# Altium PCB Nodo_Ambiente_pcb.PcbDoc
Units mm, origin at the board's own origin, x right, y up, seen from the top; angles counter-clockwise.
Board outline 76 x 55 mm, 2 copper layers (Top Layer, Bottom Layer); 7 components, 15 nets, 80 pads, 0 vias.
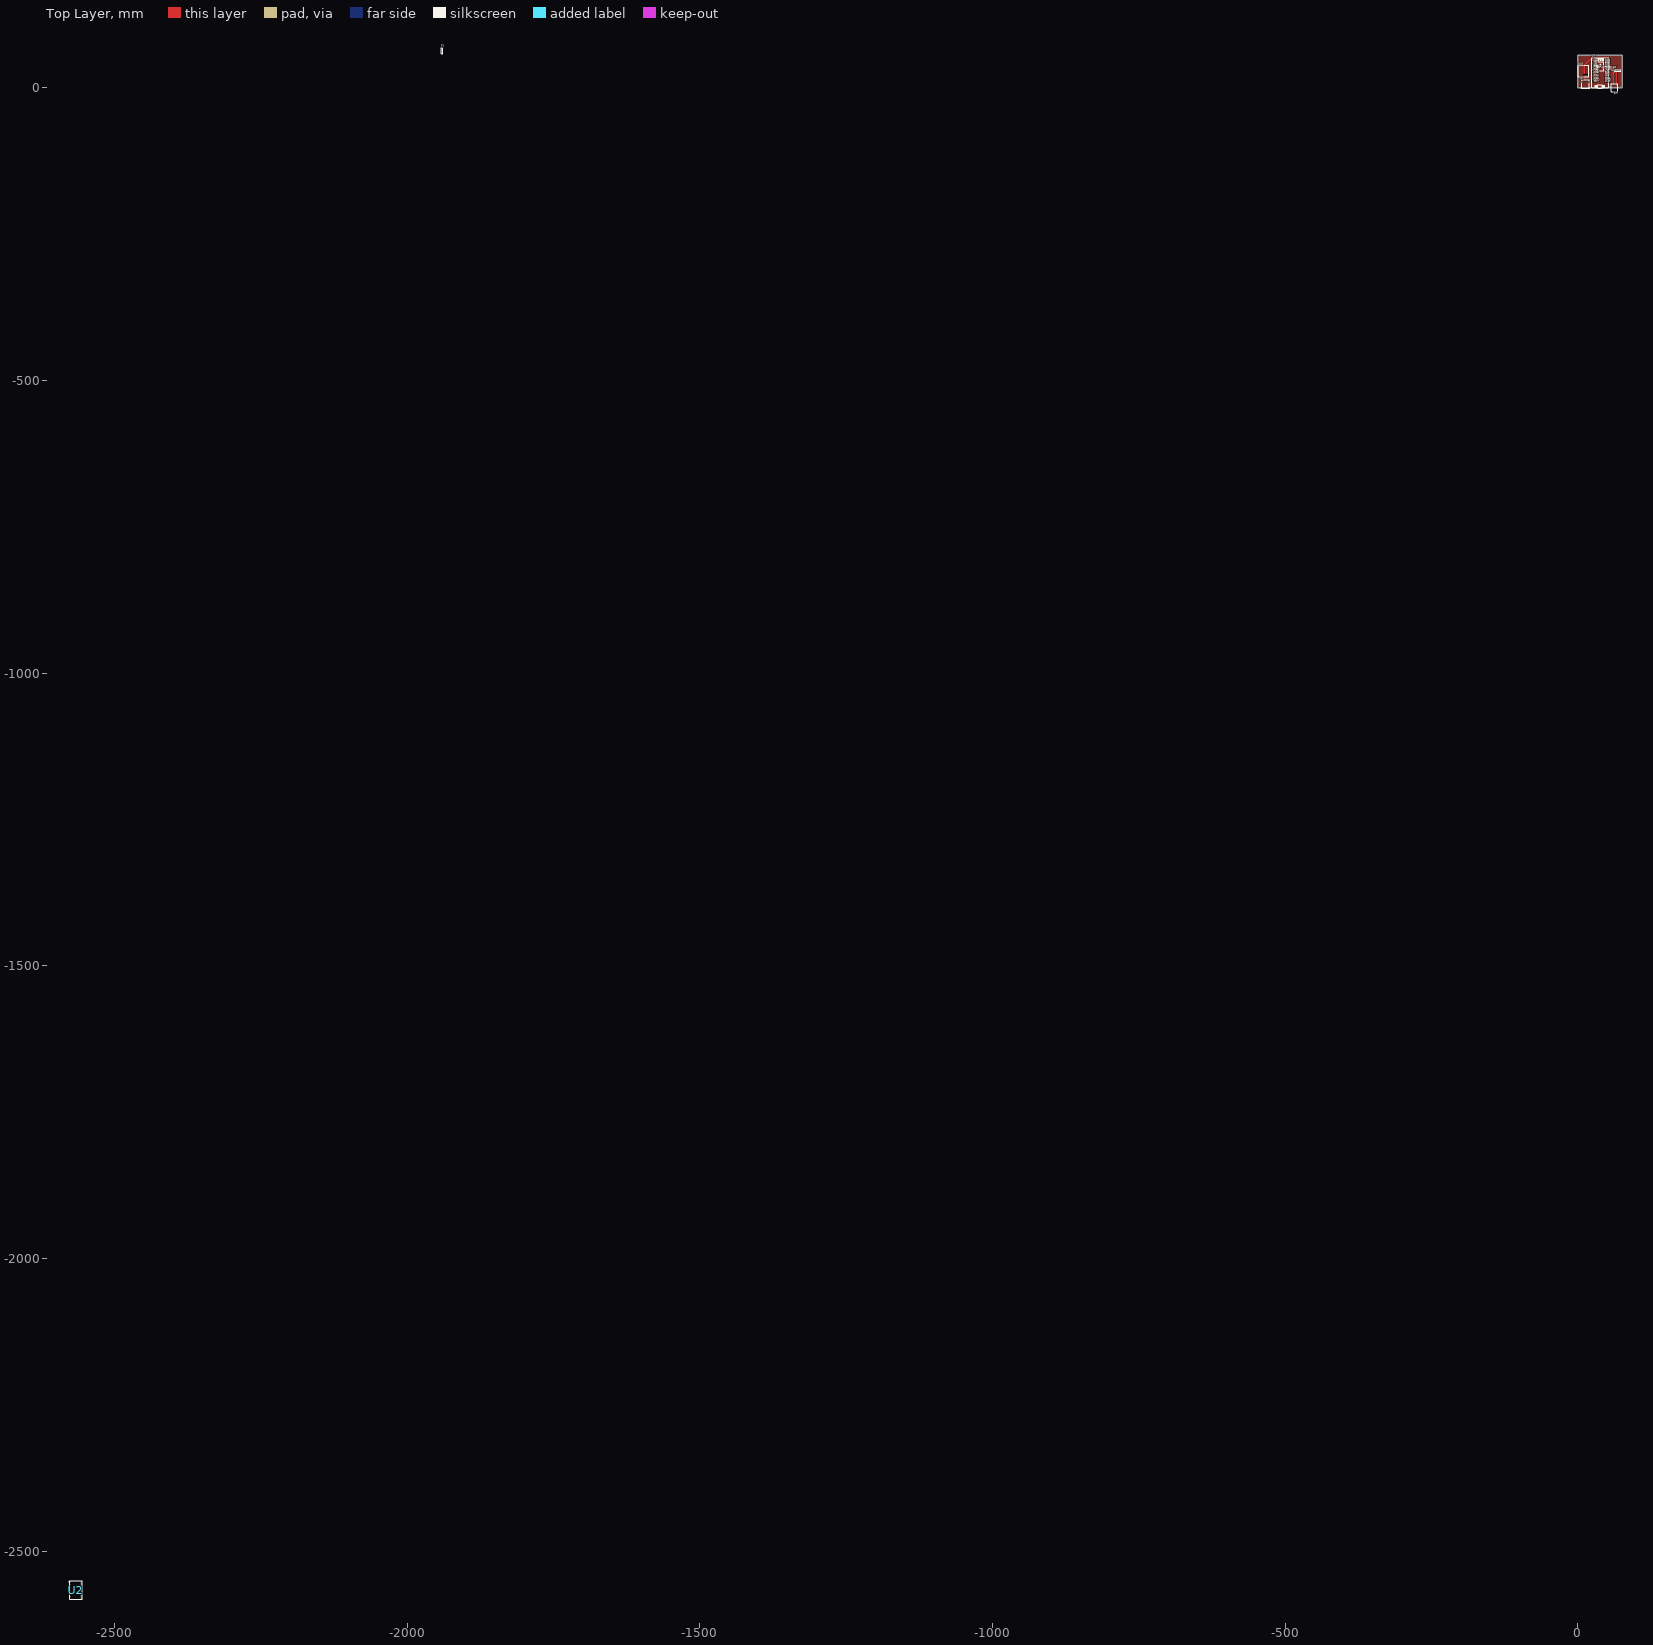
[diagram p0: Top Layer view]
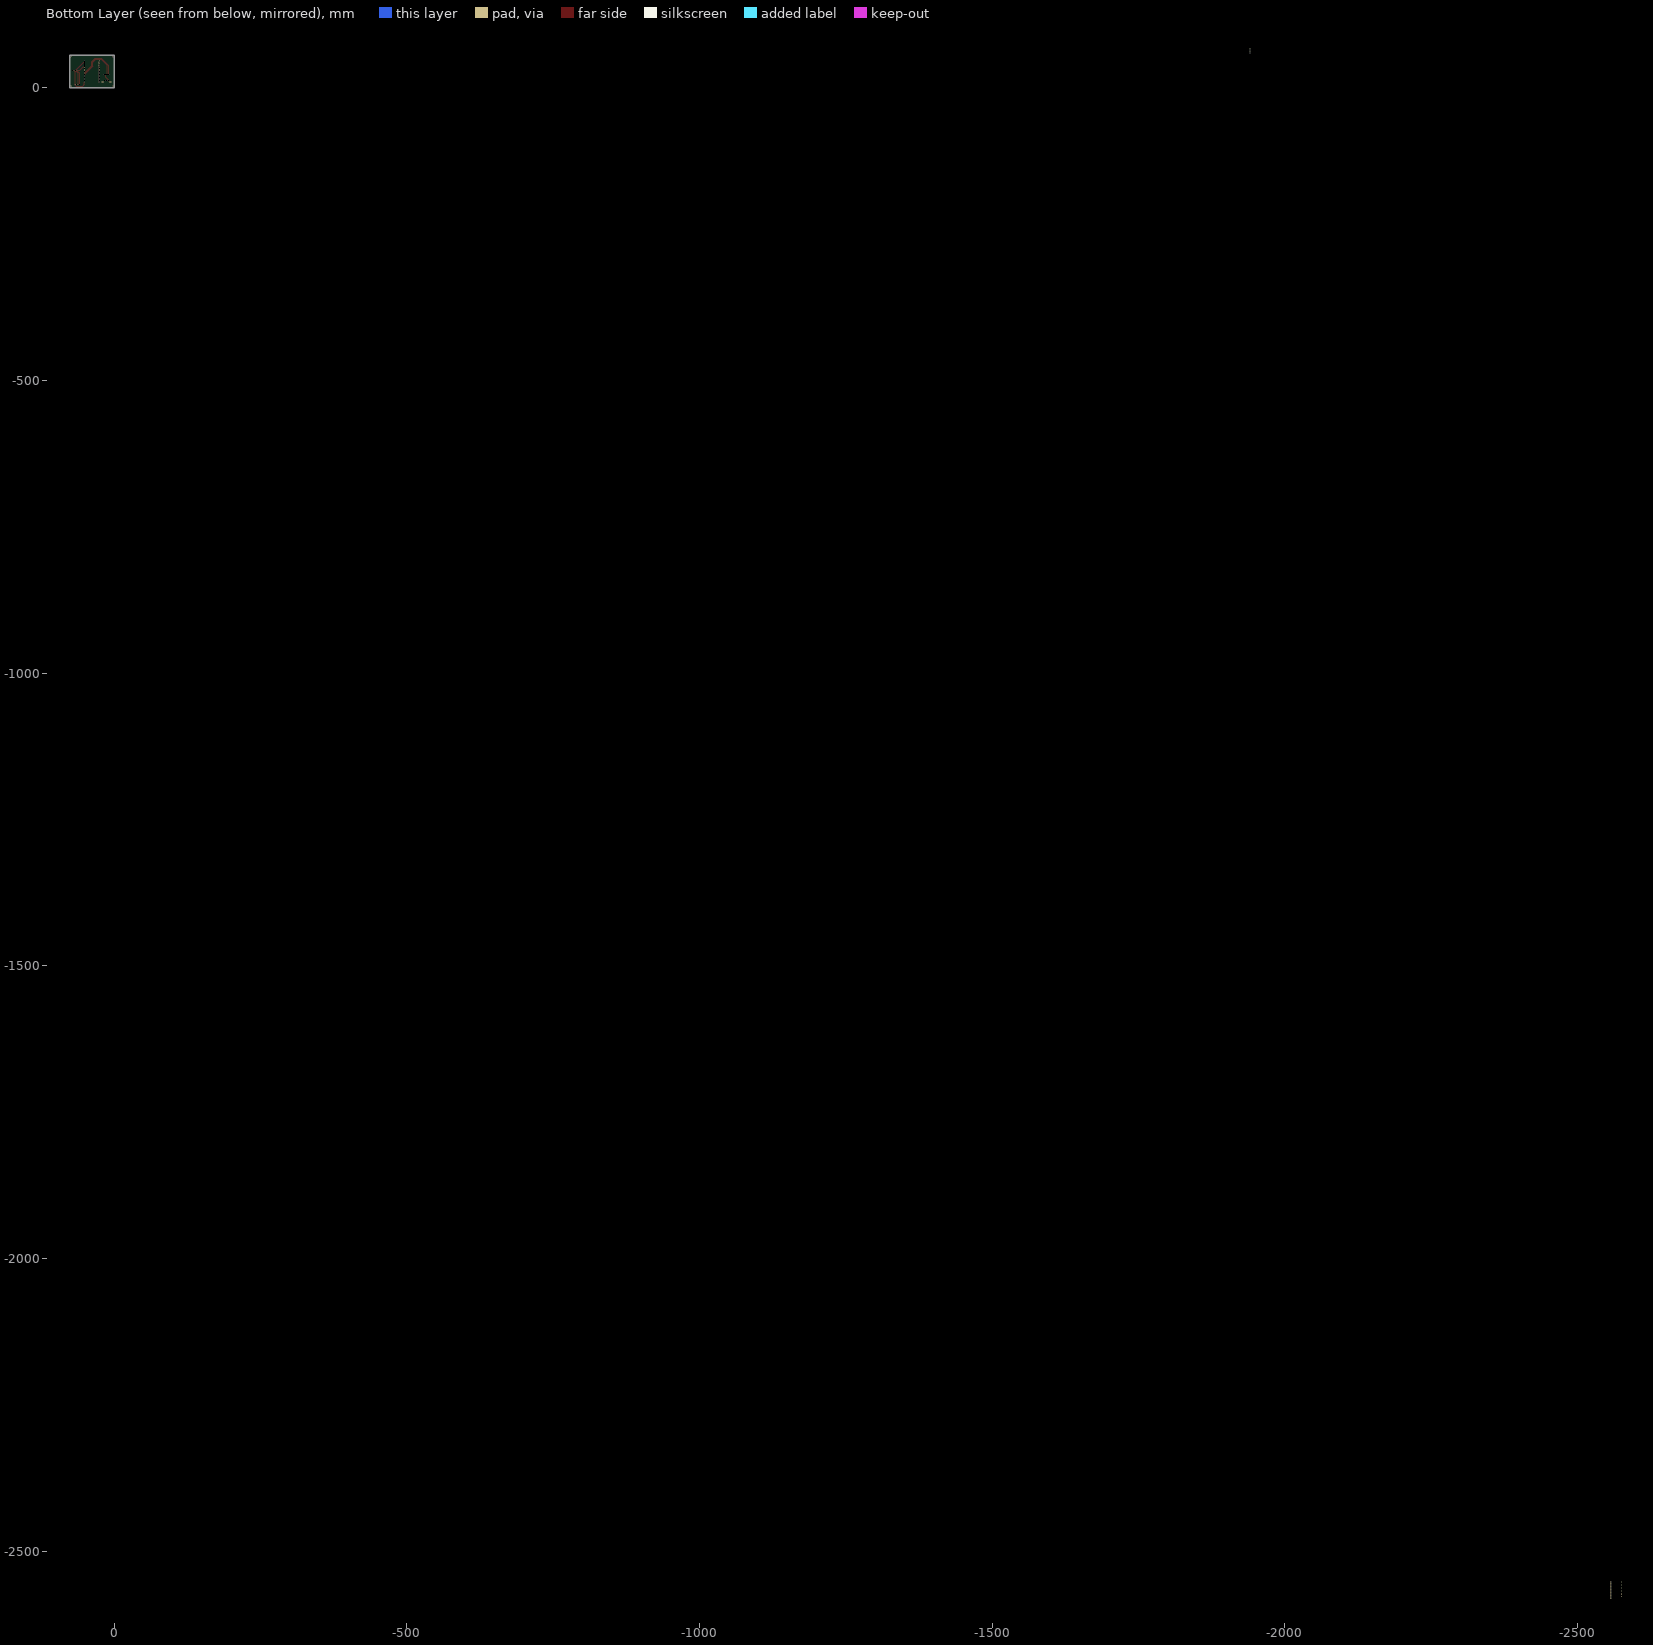
[diagram p1: Bottom Layer view, seen from below]

## Layer stack, top to bottom
Top Solder: solder mask 0.0102, Solder Resist, Dk 3.5
Top Layer: signal copper 0.0356
Dielectric 1: dielectric 0.32, FR-4, Dk 4.8
Bottom Layer: signal copper 0.0356
Bottom Solder: solder mask 0.0102, Solder Resist, Dk 3.5

## Board outline
0,0 76,0 76,55 0,55

## Design rules (kind name [scope] priority, off if disabled: settings)
Clearance [All] p1: gap=0.5 ignorepadtopadclearanceinfootprint=FALSE
PolygonConnect [All] p1: connectstyle=Relief reliefconductorwidth=0.254 reliefentries=4 polygonreliefangle="90 Angle" airgapwidth=0.254
RoutingVias [All] p1: holewidth=0.711 width=1.27 viastyle="Through Hole" minholewidth=0.711 minwidth=1.27 maxholewidth=0.711 maxwidth=1.27
SolderMaskExpansion [All] p1: expansion=0 istentingtop=FALSE
SupplyNets "Schematic Supply Nets_2" [InNet('+3V3')] p1: voltage=0.000
SupplyNets "Schematic Supply Nets_1" [InNet('+5')] p2: voltage=0.000
SupplyNets "Schematic Supply Nets" [InNet('GND')] p3: voltage=0.000
Width [All] p1: maxlimit=1 minlimit=0.254 preferedwidth=1
30 further rules are at their usual default settings.

## Classes and differential pairs
component class Nodo_Sensores: J2 U4
component class Nodo_rack: P1 U2
component class Nodo_Ambiente: J3 P2 U7 U9 U10

## Components (designator, comment, footprint, x,y, rotation, side; value= is the part's Value field where it differs from the comment)
J3 "614004190021" 614004190021 13,6.3 r0 top
P1 "TSW-104-08" SMTC-TSW-104-08-X-S -1940.56,59.309 r90 top
P2 "OLED" SMTC-TSW-104-08-X-S 71.28,29.1 r180 top
U2 "PCA9548A" PCA9548A -2565.375,-2565.375 r0 top
U7 "ESP32- 30 pin" "ESP32 - 30 pin" 37.708,23.996 r0 top
U9 "GY-SHT41" SHT41 62.56,-0.05 r180 top
U10 "PMS_Adaptor" PMS_Adaptor 1.54,18.65 r0 top

## Footprints (in the part's own frame and the unit in brackets; to place one, negate y for a bottom-side part, rotate by r counter-clockwise, add the part's x,y. Pads: shape width x height; smd on the part's side, far side on the other; paste and mask are expansions set on the pad)
614004190021 [mm] "USB 2.0 Type A Horizontal THT"
  rrect50% 1.42x1.42 hole 0.92: 1(-3.5,5.935)
  round 1.42 hole 0.92: 2(-1,5.935) 3(1,5.935) 4(3.5,5.935)
  round 3.45 hole 2.3: Shell(-6.57,3.225) Shell(6.57,3.225)
  silkscreen extent -7.25,-7.08 7.25,7.07, body extent -7.85,-7.07 7.85,7.08, height 7.8
"ESP32 - 30 pin" [mm]
  rect 2.2x2 hole 1.2 paste+0 mask+0.2: 1(-12.408,-14.496)
  oval 2.2x2 hole 1.2 paste+0 mask+0.2: 2(-12.408,-11.956) 3(-12.408,-9.416) 4(-12.408,-6.876) 5(-12.408,-4.336) 6(-12.408,-1.796) 7(-12.408,0.744) 8(-12.408,3.284) 9(-12.408,5.824) 10(-12.408,8.364) 11(-12.408,10.904) 12(-12.408,13.444) 13(-12.408,15.984) 14(-12.408,18.524) 15(-12.408,21.064) 16(12.992,-14.496) 17(12.992,-11.956) 18(12.992,-9.416) 19(12.992,-6.876) 20(12.992,-4.336) 21(12.992,-1.796) 22(12.992,0.744) 23(12.992,3.284) 24(12.992,5.824) 25(12.992,8.364) 26(12.992,10.904) 27(12.992,13.444) 28(12.992,15.984) 29(12.992,18.524) 30(12.992,21.064)
  silkscreen extent -13.87,-25.02 14.46,27.06, body extent -14,-26 14.5,27.7, height 7.95
PCA9548A [mm]
  round 2 hole 1: 1(-9.8,0) 2(-9.8,-2.54) 3(-9.8,2.54) 4(-9.8,-7.62) 5(-9.8,-10.16) 6(-9.8,-12.7) 7(-9.8,-15.24) 8(8.575,-15.4) 9(8.575,-12.86) 10(8.575,-10.32) 11(8.575,-7.78) 12(-9.8,10.16) 13(8.575,-5.24) 14(8.575,-2.7) 15(8.575,-0.16) 16(8.575,2.38) 17(8.575,4.92) 18(8.575,7.46) 19(8.575,10) 20(8.575,12.54) 21(-9.8,-5.08) 22(-9.8,5.08) 23(-9.8,7.62) 24(-9.8,12.7)
  silkscreen extent -12.35,-17 10.25,14.52, body extent -2914.63,-2914.63 -2914.63,-2914.63, height 5340.78
PMS_Adaptor [mm]
  round 2 hole 1: 1(7.62,3.65) 2(10.16,3.65) 3(12.7,3.65) 4(15.24,3.65)
  silkscreen extent -1.39,0 16.7,19.19
SHT41 [mm]
  round 2 hole 1: 1(-3.88,-5.25) 2(-1.34,-5.25) 3(1.2,-5.25) 4(3.74,-5.25)
  silkscreen extent -5.31,-6.7 5.2,6.6, body extent -5.2,-6.6 5.2,6.65, height 5.48
SMTC-TSW-104-08-X-S [mm] ".025 SQ Post Terminal Strip Assembly, 1x4 Pins, Vertical, 2.54mm Pitch, Male"
  rect 1.55x1.55 hole 1.02: 1(0,0)
  round 1.55 hole 1.02: 2(2.54,0) 3(5.08,0) 4(7.62,0)
  silkscreen extent -1.46,-1.27 9.08,1.27, body extent -1.27,-1.27 8.89,1.27, height 8.38

## Part data
J3: library part CMP-1502-03228-3, "USB Connector, 2.0 TYPE A, RECEPTACLE, THT; Connector Type: USB Type A; Standard: USB 2.0; Gender: Receptacle; No. of...", Contact Resistance=30mΩ, Current Rating=3A, Housing Color=White, Insulation Resistance=1GΩ, Max Operating Temperature=85°C, Min Operating Temperature=-40°C, Operating Supply Voltage=30V, Connector Type=USB, Contact Material=Brass, Contact Plating=Gold, Gender=Receptacle, Insulation Material=PBT, Mount="Horizontal, Through Hole", Number of Contacts=4, Number of Pins=4, Orientation=Horizontal, REACH SVHC=No, RoHS=Compliant, USB Standard="USB 2.0"
P1 P2: library part CMP-1024-00358-1, "0.025\" SQ Post Header, Through-hole, Vertical, -55 to 125 degC, 2.54 mm Pitch, 4-Pin, Male, RoHS", PartNumber=TSW-104-08-L-S, Manufacturer=Samtec, Temperature Range="-55 to 125 degC", Mounting Technology=Through-hole, Pitch="2.54 mm", PackageVersion="DM, 8/1988", PackageReference=TSW-104-08-X-S, PackageDescription=".025[0.64] SQ. Post Terminal Strip Assembly", Orientation=Vertical, ComponentLink3URL=http://www.samtec.com/documents/webfiles/cpdf/TSW-XXX-XX-XXX-X-XX-XXX-MKT.pdf, ComponentLink3Description="Package Specification", ComponentLink2URL=http://www.samtec.com/documents/webfiles/pdf/TSW_TH.PDF, ComponentLink2Description=Datasheet, ComponentLink1URL=http://www.samtec.com, ComponentLink1Description="Manufacturer URL", RoHS=True, DatasheetVersion=F-214

## Free pads (board coordinates)
  oval 2x2.5 hole 2 paste+0.256: 1(2.16,2.27) 1(2.2,52.5) 1(74.06,2.27) 1(74.1,52.8)

## Nets (pads, with @x,y where several pads share a name; then routed paths per layer and width w, separated by ;. In a path a pad name is that pad's centre, name@x,y a point inside that pad or via, vN(x,y) a via of type N, cw(c..) or ccw(c..) an arc to the next point about the centre after c; other vN are vias at no path point)
+3V3: P1.3 P2.2 U2.24 U7.16 U9.1 | length 48.3
  Top Layer w1: U7.16@50.79,9.5 50.79,5.61 54.7,1.7 64,1.7 66.249,3.949 66.249,4.738 66.279,4.768 U9.1@66.662,4.768 ; U9.1@66.68,4.75 66.68,27.04 P2.2
+5: J3.1 U10.3 | length 13.3
  Top Layer w1: 9.5,10.935 9.5,12.617 14.24,17.357 U10.3
FLAME_S: 
GND: J3.4 J3.Shell P1.4 P2.1 pad.1 U2.1 U2.2 U2.12 U2.21 U7.2 U7.17 U9.2 U10.4
NetP3_2: 
NetP3_3: 
NetP3_4: 
RX: U7.21 U10.2 | length 72.9
  Top Layer w1: U10.2 11.7,37.879 21.121,47.3 31.8,47.3 36.1,43 36.1,36.412 49.772,22.74 49.789,22.74 50.329,22.2 U7.21@50.905,22.2
SC2: U2.9
SC3: U2.11
SCL: P1.2 P2.3 U2.22 U7.29 U9.3 | length 47.6
  Top Layer w1: U7.29@50.519,42.5 52.8,42.5 P2.3 61.36,24.26 U9.3@61.36,4.75
SD2: U2.8
SD3: U2.10
SDA: P1.1 P2.4 U2.23 U7.26 U9.4 | length 41.8
  Top Layer w1: U7.26@50.62,34.8 53.837,34.8 59.537,29.1 P2.4 58.82,24.26 U9.4@58.82,4.75
TX: U7.22 U10.1 | length 76.1
  Top Layer w1: U10.1 9.16,37.46 20.8,49.1 33,49.1 37.762,44.338 37.762,37.289 50.821,24.23 U7.22@50.821,24.2
pads on no net: J3.2 J3.3 U2.3 U2.4 U2.5 U2.6 U2.7 U2.13 U2.14 U2.15 U2.16 U2.17 U2.18 U2.19 U2.20 U7.1 U7.3 U7.4 U7.5 U7.6 U7.7 U7.8 U7.9 U7.10 U7.11 U7.12 U7.13 U7.14 U7.15 U7.18 U7.19 U7.20 U7.23 U7.24 U7.25 U7.27 U7.28 U7.30

## Polygon pours and split planes (outlines as drawn)
GND on Top Layer "GND" (solid, pour order 0): 0,55 0,0 76,0 76,55

## Text inside footprints (layer, text, board x,y; h text height)
U7: Top Overlay "VN" at 26.91,39.479 h0.76; Top Overlay "D15" at 47.056,14.166 h0.76; Top Overlay "D2" at 47.69,16.736 h0.76; Top Overlay "D4" at 47.657,19.276 h0.76; Top Overlay "RX2" at 46.976,21.816 h0.76; Top Overlay "TX2" at 46.976,24.356 h0.76; Top Overlay "D5" at 47.818,26.866 h0.76; Top Overlay "D18" at 47.31,29.279 h0.76; Top Overlay "D19" at 47.31,31.946 h0.76; Top Overlay "D21" at 47.289,34.516 h0.76; Top Overlay "TX0" at 46.976,39.596 h0.76; Top Overlay "D22" at 46.976,42.032 h0.76; Top Overlay "D23" at 46.929,44.646 h0.76; Top Overlay "EN" at 26.91,44.559 h0.76; Top Overlay "VP" at 26.863,42.106 h0.76; Top Overlay "D34" at 26.91,36.835 h0.76; Top Overlay "3v3" at 47.047,9.012 h0.76; Top Overlay "D35" at 26.91,34.399 h0.76; Top Overlay "D32" at 26.91,31.859 h0.76; Top Overlay "D33" at 26.91,29.319 h0.76; Top Overlay "D25" at 26.91,26.779 h0.76; Top Overlay "D26" at 26.91,24.389 h0.76; Top Overlay "D27" at 26.91,21.699 h0.76; Top Overlay "D14" at 26.91,19.159 h0.76; Top Overlay "D12" at 26.91,16.619 h0.76; Top Overlay "D13" at 26.91,14.079 h0.76; Top Overlay "GND" at 26.91,11.539 h0.76; Top Overlay "ESP-WROOM-32" at 32.498,32.679 h0.9; Top Overlay "VIN" at 26.91,8.999 h0.76; Top Overlay "RX0" at 46.976,37.056 h0.76; Top Overlay "GND" at 46.943,11.552 h0.76